# Altium PCB MISKO.PcbDoc
Units mm, origin at the board's own origin, x right, y up, seen from the top; angles counter-clockwise.
Board outline 90 x 90 mm, 2 copper layers (Top Layer, Bottom Layer), stack 1.569 mm thick; 98 components, 74 nets, 316 pads, 0 vias.
Unrouted connection lines stored in the file: 212.
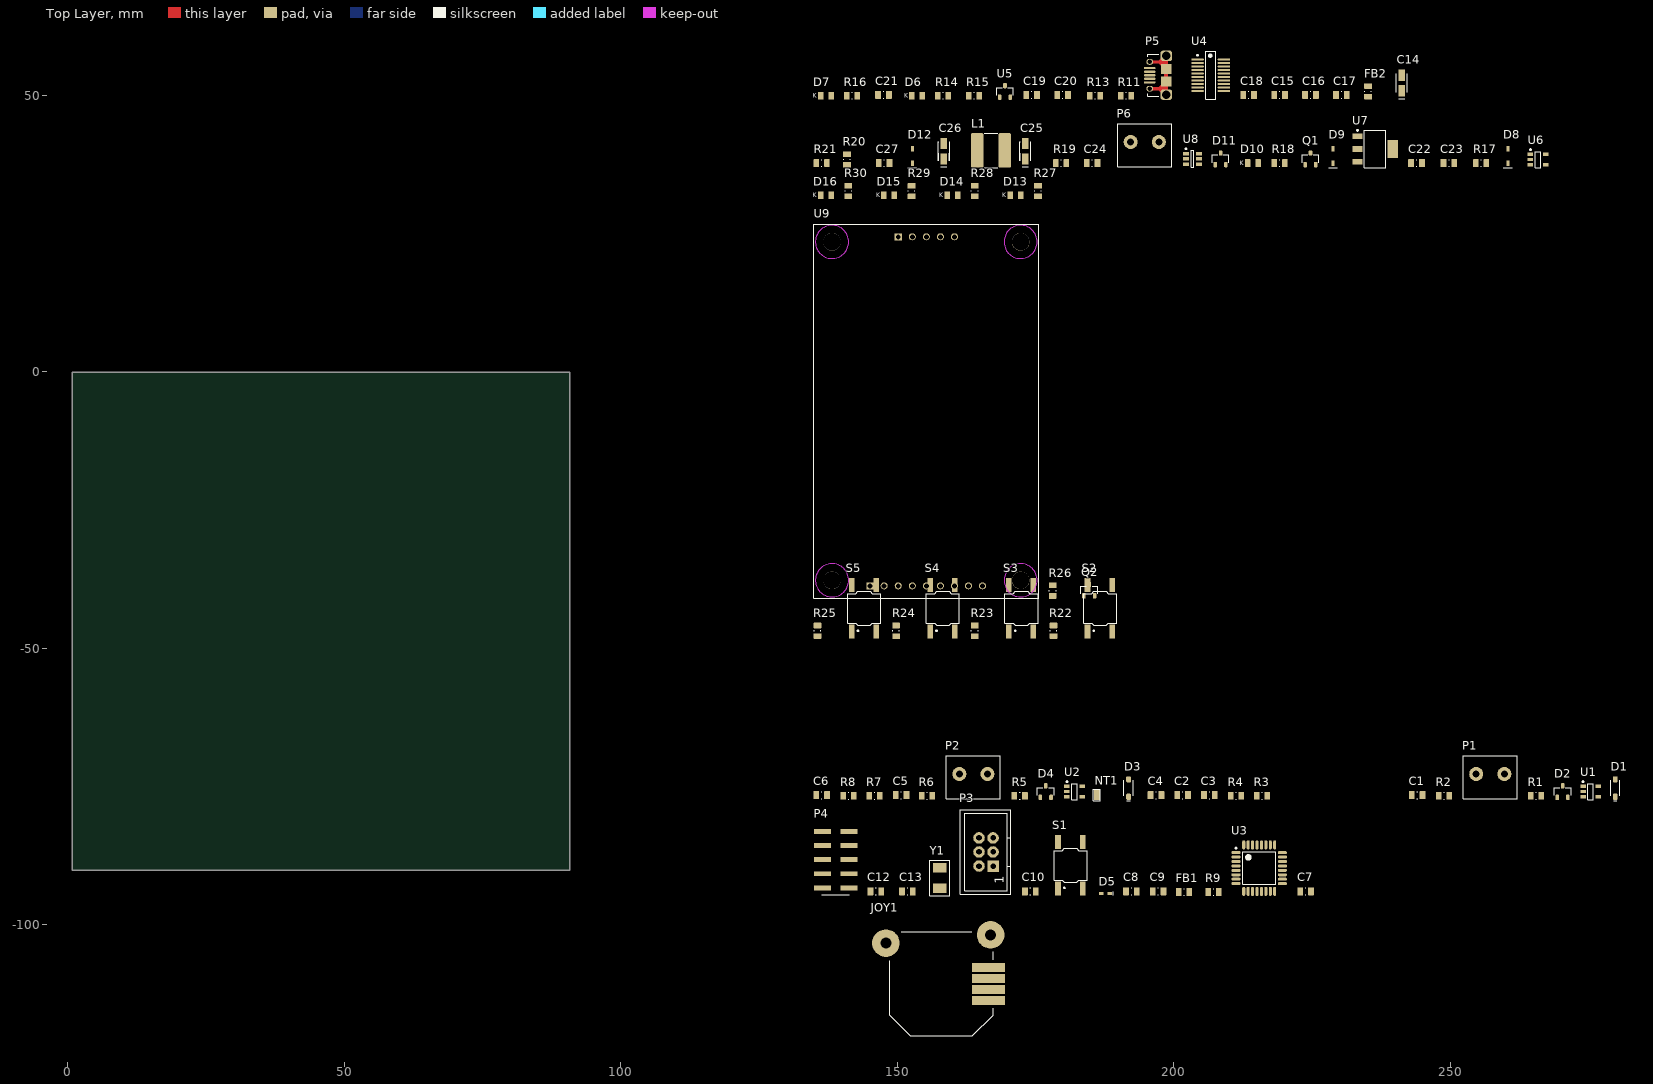
[diagram p0: Top Layer view]
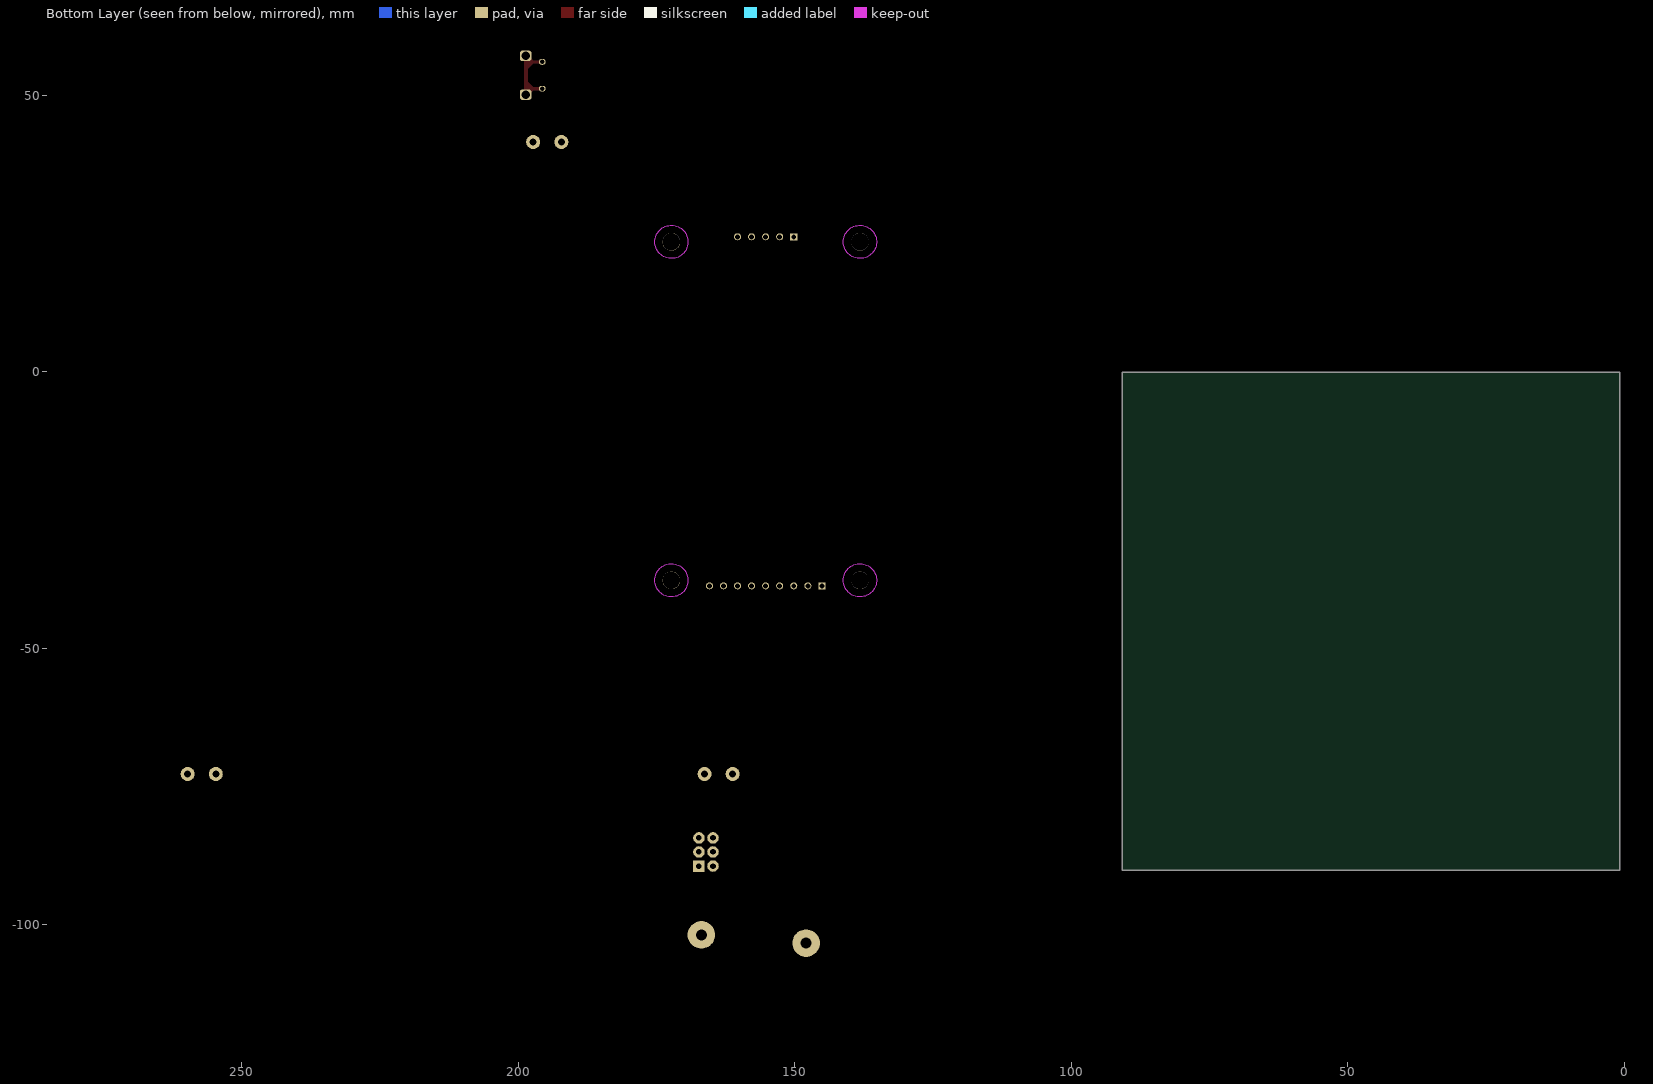
[diagram p1: Bottom Layer view, seen from below]

## Layer stack, top to bottom
Top Solder: solder mask 0.0254, SM-001, Dk 4
Top Layer: signal copper 0.035
Dielectric 1: core 1.4986, Core-043, Dk 4.3
Bottom Layer: signal copper 0.035
Bottom Solder: solder mask 0.0254, SM-001, Dk 4

## Board outline
0.78,-90.114 90.78,-90.114 90.78,-0.114 0.78,-0.114

## Design rules (kind name [scope] priority, off if disabled: settings)
Clearance [All] p1: gap=0.254 ignorepadtopadclearanceinfootprint=FALSE
DiffPairsRouting [All] p1: maxlimit=0.254 minlimit=0.254 mostfreqgap=0.254 toplayer_minwidth=0.381 toplayer_maxwidth=0.381 toplayer_prefwidth=0.381 bottomlayer_minwidth=0.381 bottomlayer_maxwidth=0.381 bottomlayer_prefwidth=0.381 maxuncoupledlength=12.7
PolygonConnect [All] p1: connectstyle=Relief reliefconductorwidth=0.254 reliefentries=4 polygonreliefangle="90 Angle" airgapwidth=0.254
RoutingVias [All] p1: holewidth=0.711 width=1.27 viastyle="Through Hole" minholewidth=0.711 minwidth=1.27 maxholewidth=0.711 maxwidth=1.27
SolderMaskExpansion [All] p1: expansion=0 istentingtop=FALSE
SupplyNets "Schematic Supply Nets_9" [InNet('+5V USB')] p1: voltage=0.000
SupplyNets "Schematic Supply Nets_8" [InNet('+5V')] p2: voltage=0.000
SupplyNets "Schematic Supply Nets_7" [InNet('AGND')] p3: voltage=0.000
SupplyNets "Schematic Supply Nets_6" [InNet('+5V SMPS')] p4: voltage=0.000
SupplyNets "Schematic Supply Nets_5" [InNet('VCCIO')] p5: voltage=0.000
SupplyNets "Schematic Supply Nets_4" [InNet('VCC')] p6: voltage=0.000
SupplyNets "Schematic Supply Nets_3" [InNet('SHLD')] p7: voltage=0.000
SupplyNets "Schematic Supply Nets_2" [InNet('AVCC')] p8: voltage=0.000
SupplyNets "Schematic Supply Nets_1" [InNet('GND')] p9: voltage=0.000
SupplyNets "Schematic Supply Nets" [InNet('VCCUSB')] p10: voltage=0.000
Width [All] p1: maxlimit=0.254 minlimit=0.254 preferedwidth=0.254
29 further rules are at their usual default settings.

## Classes and differential pairs
net class LED[1..4]: LED1 LED2 LED3 LED4
net class "LCD+SDC signals": BCKL_EN "LCD CS" "LCD+SDC signals.LCD DC" "LCD+SDC signals.LCD RST" "LCD+SDC signals.MISO" "LCD+SDC signals.MOSI" "LCD+SDC signals.SCK" "LCD+SDC signals.SD CS"
net class BTN[1..4]: BTN1 BTN2 BTN3 BTN4
component class U_USB: C14 C15 C16 C17 C18 C19 C20 C21 D6 D7 FB2 P5 R11 R13 R14 R15 R16 U4 U5
component class U_PS: C22 C23 C24 C25 C26 C27 D8 D9 D10 D11 D12 L1 P6 Q1 R17 R18 R19 R20 R21 U6 U7 U8
component class U_LED: D13 D14 D15 D16 R27 R28 R29 R30
component class U_LCD: Q2 R26 U9
component class U_BTN: R22 R23 R24 R25 S2 S3 S4 S5
component class U_ANLG: C1 C2 C3 C4 C5 C6 D1 D2 D3 D4 JOY1 NT1 P1 P2 R1 R2 R3 R4 R5 R6 R7 R8 U1 U2
component class MISKO: C7 C8 C9 C10 C12 C13 D5 FB1 P3 P4 R9 S1 U3 Y1
differential pair DF: +DF_P -DF_N
differential pair D: +D_P -D_N

## Components (designator, comment, footprint, x,y, rotation, side; value= is the part's Value field where it differs from the comment)
C1 "comment" C_0805 244.044,-76.558 r0 top value=100n
C2 "comment" C_0805 201.626,-76.558 r0 top value=100n
C3 "comment" C_0805 206.452,-76.558 r0 top value=100n
C4 "comment" C_0805 196.8,-76.558 r0 top value=1u
C5 "comment" C_0805 150.699,-76.558 r0 top value=100n
C6 "comment" C_0805 136.348,-76.558 r0 top value=1u
C7 "comment" C_0805 223.851,-93.957 r0 top value=100n
C8 "comment" C_0805 192.355,-93.957 r0 top value=100n
C9 "comment" C_0805 197.181,-93.957 r0 top value=100n
C10 "comment" C_0805 174.067,-93.957 r0 top value=10n
C12 "comment" C_0805 146.127,-93.957 r0 top value=18p
C13 "comment" C_0805 151.842,-93.957 r0 top value=18p
C14 "comment" "Tantalum Case A" 241.25,52.22 r90 top value=4u7
C15 "comment" C_0805 219.152,50.061 r0 top value=10n
C16 "comment" C_0805 224.74,50.061 r0 top value=100n
C17 "comment" C_0805 230.328,50.061 r0 top value=100n
C18 "comment" C_0805 213.564,50.061 r0 top value=100n
C19 "comment" C_0805 174.321,50.061 r0 top value=47p
C20 "comment" C_0805 179.909,50.061 r0 top value=47p
C21 "comment" C_0805 147.524,50.061 r0 top value=4p7
C22 "comment" C_0805 243.917,37.742 r0 top value=4u7
C23 "comment" C_0805 249.759,37.742 r0 top value=4u7
C24 "comment" C_0805 185.243,37.742 r0 top value=100n
C25 "comment" "Tantalum Case A" 173.178,39.901 r90 top value=22u
C26 "comment" "Tantalum Case A" 158.446,39.901 r90 top value=47u
C27 "comment" C_0805 147.651,37.742 r0 top value=100n
D1 "3.6V" SOD-123_N 279.858,-75.288 r90 top
D2 "DB3X313F" SOT23-3 270.333,-75.923 r0 top
D3 "3.6V" SOD-123_N 191.847,-75.288 r90 top
D4 "DB3X313F" SOT23-3 176.861,-75.923 r0 top
D5 "5.3V" SOD-523 187.656,-94.338 r0 top
D6 "comment" LED_0805 153.62,49.934 r0 top
D7 "LED Yellow" LED_0805 137.11,49.934 r0 top
D8 "BAT760-7" SOD-323 260.427,39.012 r90 top
D9 "BAT760-7" SOD-323 228.804,39.012 r90 top
D10 "LED Red" LED_0805 214.326,37.742 r0 top
D11 "BAS16" SOT23-3 208.484,38.504 r0 top
D12 "BAT760-7" SOD-323 152.731,39.012 r90 top
D13 "LED Blue" LED_0805 171.4,31.9 r0 top
D14 "LED Blue" LED_0805 159.97,31.9 r0 top
D15 "LED Blue" LED_0805 148.54,31.9 r0 top
D16 "LED Blue" LED_0805 137.11,31.9 r0 top
FB1 "value" SMD_0805 201.88,-94.084 r0 top
FB2 "value" SMD_0805 235.154,50.696 r90 top
JOY1 "joystick" PSP1000JOY 158,-110.725 r180 top
L1 "680mA" IND_6060_N 166.955,40.028 r0 top value=100u
NT1 "net tie 2-way" "NET TIE 2-way" 186.132,-76.558 r90 top net-tie
P1 "ANLG IN 1" "VRSTNA SPONKA 2P/16A" 257.252,-72.748 r0 top
P2 "ANGL IN 2" "VRSTNA SPONKA 2P/16A" 163.78,-72.748 r0 top
P3 "ISP" "HEADER 2X3 SHROUDED" 166.066,-86.845 r90 top
P4 "AUX SGNLS" "HEADER SMD 2X5 100 MILS" 138.888,-88.242 r90 top
P5 "micro USB B" micro-USB-HRS-ZX62D-B-5PA8 198.578,53.617 r0 top
P6 "Power in" "VRSTNA SPONKA 2P/16A" 194.768,41.552 r0 top
Q1 "2N7002,215" SOT23-3 224.74,38.504 r0 top
Q2 "PMV160UP,215" SOT23-3 184.735,-39.474 r0 top
R1 "comment" R_0805 265.507,-76.685 r0 top value=1k
R2 "comment" R_0805 248.87,-76.685 r0 top value=100R
R3 "comment" R_0805 215.977,-76.685 r0 top value=9k1
R4 "comment" R_0805 211.278,-76.685 r0 top value=1k
R5 "comment" R_0805 172.162,-76.685 r0 top value=1k
R6 "comment" R_0805 155.398,-76.685 r0 top value=100R
R7 "comment" R_0805 145.873,-76.685 r0 top value=100k
R8 "comment" R_0805 141.174,-76.685 r0 top value=1k
R9 "comment" R_0805 207.214,-94.084 r0 top value=100k
R11 "comment" R_0805 191.339,49.934 r0 top value=27R
R13 "comment" R_0805 185.751,49.934 r0 top value=27R
R14 "comment" R_0805 158.319,49.934 r0 top value=1M
R15 "comment" R_0805 163.907,49.934 r0 top value=270R
R16 "comment" R_0805 141.809,49.934 r0 top value=270R
R17 "comment" R_0805 255.601,37.742 r0 top value=10k
R18 "comment" R_0805 219.152,37.742 r0 top value=270R
R19 "comment" R_0805 179.655,37.742 r0 top value=100k
R20 "comment" R_0805 140.92,38.377 r90 top value="52k3 1%"
R21 "comment" R_0805 136.348,37.742 r0 top value="10k 1%"
R22 "1k" R_0805 178.258,-46.84 r90 top
R23 "1k" R_0805 164.034,-46.84 r90 top
R24 "1k" R_0805 149.81,-46.84 r90 top
R25 "1k" R_0805 135.586,-46.84 r90 top
R26 "10R" R_0805 178.131,-39.601 r90 top
R27 "270R" R_0805 175.464,32.662 r90 top
R28 "270R" R_0805 164.034,32.662 r90 top
R29 "270R" R_0805 152.604,32.662 r90 top
R30 "270R" R_0805 141.174,32.662 r90 top
S1 "" "PUSH BUTTON 6x6 mm" 181.306,-89.258 r90 top
S2 "" "PUSH BUTTON 6x6 mm" 186.64,-42.776 r90 top
S3 "" "PUSH BUTTON 6x6 mm" 172.416,-42.776 r90 top
S4 "" "PUSH BUTTON 6x6 mm" 158.192,-42.776 r90 top
S5 "" "PUSH BUTTON 6x6 mm" 143.968,-42.776 r90 top
U1 "ADA4000-1" SOT23-5 275.413,-75.923 r0 top
U2 "ADA4000-1" SOT23-5 182.068,-75.923 r0 top
U3 "ATmega328PB-AUR" 32A_N 215.469,-89.766 r0 top
U4 "FT231XS-R" SSOP-20 206.706,53.617 r0 top
U5 "TPD2E009DBZR" SOT23-3 169.495,50.696 r0 top
U6 "STMPS2151" SOT23-5 265.888,38.377 r0 top
U7 "REG1117-3.3" SOT-223-4 236.424,40.282 r0 top
U8 "LM2734" SOT-23-6-THIN 203.404,38.504 r0 top
U9 "TFT LCD 2.2" "LCD tft 2.2" 155.271,-7.089 r90 top
Y1 "16MHz" "TXC 7a QUARTZ CRYSTAL" 157.684,-91.544 r90 top

## Footprints (in the part's own frame and the unit in brackets; to place one, negate y for a bottom-side part, rotate by r counter-clockwise, add the part's x,y. Pads: shape width x height; smd on the part's side, far side on the other; paste and mask are expansions set on the pad)
32A_N [mm]
  oval 1.65x0.55 smd: 1(-4.2,2.8) 2(-4.2,2) 3(-4.2,1.2) 4(-4.2,0.4) 5(-4.2,-0.4) 6(-4.2,-1.2) 7(-4.2,-2) 8(-4.2,-2.8) 17(4.2,-2.8) 18(4.2,-2) 19(4.2,-1.2) 20(4.2,-0.4) 21(4.2,0.4) 22(4.2,1.2) 23(4.2,2) 24(4.2,2.8)
  oval 0.55x1.65 smd: 9(-2.8,-4.2) 10(-2,-4.2) 11(-1.2,-4.2) 12(-0.4,-4.2) 13(0.4,-4.2) 14(1.2,-4.2) 15(2,-4.2) 16(2.8,-4.2) 25(2.8,4.2) 26(2,4.2) 27(1.2,4.2) 28(0.4,4.2) 29(-0.4,4.2) 30(-1.2,4.2) 31(-2,4.2) 32(-2.8,4.2)
  silkscreen extent -4.32,-2.95 2.95,3.75, body extent -3.5,-3.5 3.5,3.5, height 1.2
C_0805 [mm] "Chip Capacitor, 2-Leads, Body 2.05x1.25mm, IPC Medium Density"
  rrect15% 1.05x1.45 smd: 1(-0.975,0) 2(0.975,0)
  silkscreen extent -0.05,-0.63 0.05,0.63, body extent -1.1,-0.7 1.1,0.7, height 1.4
"HEADER 2X3 SHROUDED" [mil]
  rect 82x82 hole 39.37: 1(-100,-50)
  round 82 hole 39.37: 2(-100,50) 3(0,-50) 4(0,50) 5(100,-50) 6(100,50)
  silkscreen extent -300,-175 300,185, body extent -300,-175 300,187, height 372
"HEADER SMD 2X5 100 MILS" [mm]
  rect 0.9x3.1 smd: 1(-5.08,-2.425) 2(-5.08,2.425) 3(-2.54,-2.425) 4(-2.54,2.425) 5(0,-2.425) 6(0,2.425) 7(2.54,-2.425) 8(2.54,2.425) 9(5.08,-2.425) 10(5.08,2.425)
  silkscreen extent -6.33,-2.45 -6.33,2.55, body extent -6.33,-3.55 6.37,3.65, height 9.85
IND_6060_N [mm] "Inductor, Chip; 6.00 mm L X 6.00 mm W X 2.80 mm H body"
  rrect22% 2.24x6.22 smd: 1(-2.49,0) 2(2.49,0)
  silkscreen extent -1.19,-3.1 1.19,3.1, body extent -3,-3 3,3, height 4.51
"LCD tft 2.2" [mm]
  rect 1.27x1.27 hole 0.9: 1(-31.627,10.16) 10(31.5,5.08)
  round 1.27 hole 0.9: 2(-31.627,7.62) 3(-31.627,5.08) 4(-31.627,2.54) 5(-31.627,0) 6(-31.627,-2.54) 7(-31.627,-5.08) 8(-31.627,-7.62) 9(-31.627,-10.16) 11(31.5,2.54) 12(31.5,0) 13(31.5,-2.54) 14(31.5,-5.08)
  round 3.2 hole 3.2 unplated paste-2539.97: M1(-30.627,17.05) M2(30.573,17.05) M3(-30.627,-17.05) M4(30.573,-17.05)
  Keep-Out Layer circle w0.102: c-30.627,17.05 r3
  Keep-Out Layer circle w0.102: c-30.627,-17.05 r3
  Keep-Out Layer circle w0.102: c30.573,-17.05 r3
  Keep-Out Layer circle w0.102: c30.573,17.05 r3
  silkscreen extent -33.91,-20.3 33.78,20.34, body extent -33.5,-20 33.5,20, height 17.11
LED_0805 [mm] "SMD LED, 2-Leads, Body 2.05x1.25mm, IPC Medium Density"
  rrect15% 1x1.4 smd: 1(-0.95,0) 2(0.95,0)
  body extent -1,-0.62 1,0.63, height 0.7
micro-USB-HRS-ZX62D-B-5PA8 [mm]
  rrect100% 1.25x1.05 hole 0.85: 0(-2.905,-2.425) 0(-2.905,2.425)
  rrect50% 2.1x1.9 hole 1.5: 0(0.095,-3.512) 0(0.095,3.512)
  rect 1.9x1.8 smd: 0(0.095,-1.15) 0(0.095,1.15)
  rrect50% 2x0.4 smd: 1(-2.905,-1.3) 2(-2.905,-0.65) 3(-2.905,0) 4(-2.905,0.65) 5(-2.905,1.3)
  Top Layer region: -2.921,-2.159 -1.27,-2.159 -0.254,-1.143 -0.254,1.143 -1.27,2.159 -2.921,2.159 -2.921,2.667 -1.27,2.667 -0.381,3.556 0.381,3.556 0.381,-3.556 -0.381,-3.556 -1.27,-2.667 -2.921,-2.667
  silkscreen extent -3.3,-3.81 -1.27,3.81, body extent -2.65,-4.1 2.78,4.1, height 2.68
"NET TIE 2-way" [mil] "2-way net tie junction"
  rrect5% 40x40 smd paste-100: 1(-15,0) 2(15,0)
  silkscreen extent -40,-25 40,25
PSP1000JOY [mm]
  rect 6x1.65 smd: 1(-8.5,-3) 2(-8.5,-1) 3(-8.5,1) 4(-8.5,3)
  round 5 hole 2: 5(-8.904,-8.904) 6(10.055,-7.4)
  silkscreen extent -9.38,-9.5 9.38,9.38, body extent -11.82,-11.82 12.1,9.48, height 9.65
"PUSH BUTTON 6x6 mm" [mm]
  rect 2.5x1 smd: 1(-4.191,2.222) 2(-4.191,-2.223) 3(4.191,-2.222) 4(4.191,2.223)
  silkscreen extent -4.19,-3.06 3.05,2.94, body extent -4.44,-2.98 4.56,3.02, height 5
R_0805 [mm] "Chip Resistor, 2-Leads, Body 2.05x1.25mm, IPC Medium Density"
  rrect15% 1x1.4 smd: 1(-0.95,0) 2(0.95,0)
  silkscreen extent -0.05,-0.6 0.05,0.6, body extent -1.1,-0.7 1.1,0.7, height 0.8
SMD_0805 [mm] "Chip 2-Leads, Body 2.05x1.25mm, IPC Medium Density"
  rrect15% 1x1.4 smd: 1(-0.95,0) 2(0.95,0)
  silkscreen extent -0.05,-0.6 0.05,0.6, body extent -1.1,-0.7 1.1,0.7, height 0.8
SOD-123_N [mm] "Diode, Small Outline Diode (SOD); 2.675 mm L X 1.60 mm W X 1.30 mm H body"
  rrect51% 1.12x0.86 smd: A(1.575,0) C(-1.575,0)
  silkscreen extent -2.31,-0.85 1.4,0.85, body extent -1.8,-0.8 1.8,0.8, height 1.3
SOD-323 [mm]
  rect 1x0.55 smd: A(1.3,0) C(-1.3,0)
  silkscreen extent -2.16,-0.8 -2.16,0.8, body extent -1.3,-0.67 1.3,0.68, height 1.1
SOD-523 [mm]
  rect 0.825x0.5 smd: A(-0.788,0) C(0.788,0)
  silkscreen extent 1.4,-0.3 1.4,0.3, body extent -0.82,-0.45 0.87,0.45, height 0.7
SOT23-3 [mm] "Small Outline Transistor (SOT23), 0.96 mm pitch; 3 pin, 2.92 mm L X 1.30 mm W X 1.12 mm H body"
  rrect49% 0.65x0.96 smd: 1(-0.96,-1.045) 2(0.96,-1.045) 3(0,1.045)
  silkscreen extent -1.52,-0.7 1.52,0.7, body extent -1.46,-1.18 1.46,1.18, height 1.12
SOT23-5 [mm]
  rect 1x0.6 smd: 1(-1.375,0.95) 2(-1.375,0) 3(-1.375,-0.95) 4(1.375,-0.95) 5(1.375,0.95)
  silkscreen extent -1.5,-1.45 0.5,1.92, body extent -1.41,-1.45 1.41,1.45, height 1.45
SOT-23-6-THIN [mm] "6-  pin Thin SOT package"
  rect 1.1x0.65 smd: 1(-1.2,0.95) 2(-1.2,0) 3(-1.2,-0.95) 4(1.2,-0.95) 5(1.2,0) 6(1.2,0.95)
  silkscreen extent -1.32,-1.55 0.25,1.95, body extent -0.9,-1.55 0.9,1.55, height 1
SOT-223-4 [mm]
  rect 1.85x1 smd: 1(-3.175,2.3) 2(-3.175,0) 3(-3.175,-2.3)
  rect 1.85x3.2 smd: 4(3.175,0)
  silkscreen extent -3.3,-3.35 1.95,3.47, body extent -1.85,-3.35 1.85,3.35, height 1.8
SSOP-20 [mm]
  oval 2.25x0.4 smd: 1(-2.375,2.857) 2(-2.375,2.222) 3(-2.375,1.587) 4(-2.375,0.953) 5(-2.375,0.318) 6(-2.375,-0.318) 7(-2.375,-0.953) 8(-2.375,-1.587) 9(-2.375,-2.222) 10(-2.375,-2.857) 11(2.375,-2.857) 12(2.375,-2.222) 13(2.375,-1.587) 14(2.375,-0.953) 15(2.375,-0.318) 16(2.375,0.318) 17(2.375,0.953) 18(2.375,1.587) 19(2.375,2.222) 20(2.375,2.857)
  silkscreen extent -2.5,-4.35 0.9,4.35, body extent -1.99,-4.37 1.99,4.37, height 1.76
"Tantalum Case A" [mm]
  rect 2x1.2 smd: 1(-1.4,0) 2(1.4,0)
  silkscreen extent -2.87,-1.02 1.7,1.02, body extent -1.66,-0.86 1.74,0.94, height 1.8
"TXC 7a QUARTZ CRYSTAL" [mm] "TXC 7A series crysal oscillator footprint 5X3.2"
  rect 1.7x2.4 smd: 1(-1.85,0) 2(1.85,0)
  silkscreen extent -3.17,-1.78 3.17,1.78, body extent -2.5,-1.6 2.5,1.6, height 1.26
"VRSTNA SPONKA 2P/16A" [mm]
  round 2.54 hole 1.27: 1(-2.54,0) 2(2.54,0)
  silkscreen extent -4.88,-4.44 4.88,3.3, body extent -5,-4.57 5,3.43, height 10.01

## Part data
C1 C2 C3 C4 C5 C6 C7 C8 C9 C10 C12 C13 C15 C16 C17 C18 C19 C20 C21 C22 C23 C24 C27: library part Capacitor, "Generic capacitor"
C14 C25 C26: library part "Capacitor - polarized", "Generic polarized capacitor"
D1 D3: library part MMSZ5227B, "Zener Single Diode, 3.6 V, 500 mW, SOD-123, 5 %, 2 Pins, 150 °C", HelpURL=https://www.farnell.com/datasheets/1670964.pdf, Manufacturer part number=MMSZ5227B
D2 D4: "Schottky Rectifier, 30 V, 130 mA, Dual Series, SOT-23, 3 Pins, 550 mV", HelpURL=https://www.farnell.com/datasheets/1912091.pdf, Manufacturer part number=DB3X313F
D5: library part ESD7371XV2T1G, "ESD Protection Device, 20 V, SOD-523, 2 Pins, 5.3 V, 300 mW, ESD7371 Series", HelpURL=https://www.farnell.com/datasheets/2907082.pdf, Manufacturer part number=ESD7371XV2T1G
D6: library part "LED Blue", "LED Blue"
D8 D9 D12: "Schottky Rectifier, 30 V, 1 A, Single, SOD-323, 2 Pins, 550 mV"
D11: "Silicon Switching Diode for High-Speed Switching"
FB1 FB2: library part "Ferrite bead", "Generic ferrite bead"
JOY1: "Analog joystick"
L1: library part SDR0604-101KL, "Power Inductor (SMD), 100 µH, 520 mA, Unshielded, 680 mA, SDR0604"
P1 P2 P6: library part "Screw terminal 2P 200mil", "Generic screw terminal, 2 poles, 200 mil pitch"
P3: library part "Pin header 2x3 shrouded", "Generic shrouded pin header, 2x3, male"
P4: library part M20-8760542P, "Pin Header, Vertical, Wire-to-Board, 2.54 mm, 2 Rows, 10 Contacts, Surface Mount Straight, M20-87", Manufacturer_Name=Harwin, Mouser Part Number=855-M20-8760542P, Datasheet Link=https://cdn.harwin.com/pdfs/M20-876P.pdf, Manufacturer_Part_Number=M20-8760542P, Mouser Price/Stock=https://www.mouser.co.uk/ProductDetail/Harwin/M20-8760542P?qs=vF78I%252BjhbY%252B9gKdT9lbnBA%3D%3D
P5: library part ZX62D-B-5PA8(30), "USB Connector, Micro USB Type B, USB 2.0, Receptacle, 5 Ways, Surface Mount, Through Hole Mount", Manufacturer=Hirose, Supplier Part Number 1=2300438, ComponentLink1Description=http://www.farnell.com/datasheets/1693470.pdf, ComponentLink1URL=http://www.farnell.com/datasheets/1693470.pdf, HelpURL=https://www.farnell.com/datasheets/2691174.pdf, Manufacturer part number=ZX62D-B-5PA8(30), Supplier 1=Farnell
Q1: "N-Channel Trench MOSFET, 60 V, 0.3 A, 3-Pin SOT23, Tape and Reel", Manufacturer="NXP Semiconductors", Supplier Part Number 1=568-1369-2-ND, Channel Type=N, Ciss [typ] (pF)=31, Code_JEDEC=TO-236AB, ComponentLink1Description="Manufacturer URL", ComponentLink1URL=http://www.nxp.com/, ComponentLink2Description=Datasheet, ComponentLink2URL=http://www.nxp.com/documents/data_sheet/2N7002.pdf, ComponentLink3Description="Package Specification", ComponentLink3URL=http://www.nxp.com/documents/outline_drawing/sot023_po.pdf, Coss [typ] (pF)=6.8, DatasheetVersion="Rev. 7", HelpURL=https://www.farnell.com/datasheets/1499179.pdf, ID [max] (A)=0.3, Mounting Technology="Surface Mount", PackageDescription="3-Pin Small Outline Transistor Package, Body 2.9 x 1.3 mm, Pitch 0.95 mm", PackageReference=SOT23, PackageVersion="06-03-16, 03/2006", Packing="Tape & Reel", PartNumber=2N7002,215, Qr [typ] (nC)=30, Supplier 1=Digi-Key, Supplier 2=Digi-Key, Supplier 3=Digi-Key, Supplier 4=Farnell, Supplier 5=Farnell, Supplier 6=Farnell, Supplier 7=Newark, Supplier 8=Newark, Supplier 9=Mouser, Supplier Part Number 2=568-1369-1-ND, Supplier Part Number 3=568-1369-6-ND, Supplier Part Number 4=2315576, Supplier Part Number 5=1510761, Supplier Part Number 6=1510761RL, Supplier Part Number 7=75R4879, Supplier Part Number 8=70R9742, Supplier Part Number 9=771-2N7002-T/R, VDS [max] (V)=60, VGSth [typ] (V)=2
Q2: "P-Channel Trench MOSFET, -20 V, -1.2 A, -55 to 150 degC, 3-Pin SOT23, Tape and Reel", Manufacturer="NXP Semiconductors", Supplier Part Number 1=568-10320-2-ND, Channel Type=P, Ciss [typ] (pF)=365, Code_JEDEC=TO-236AB, ComponentLink1Description="Manufacturer URL", ComponentLink1URL=http://www.nxp.com/, ComponentLink2Description=Datasheet, ComponentLink2URL=http://www.nxp.com/documents/data_sheet/PMV160UP.pdf, ComponentLink3Description="Package Specification", ComponentLink3URL=http://www.nxp.com/documents/outline_drawing/sot023_po.pdf, Coss [typ] (pF)=42, DatasheetVersion="Rev. 2", HelpURL=https://eu.mouser.com/datasheet/2/916/PMV160UP-1600107.pdf, ID [max] (A)=-1.2, Mounting Technology="Surface Mount", PackageDescription="3-Pin Small Outline Transistor Package, Body 2.9 x 1.3 mm, Pitch 0.95 mm", PackageReference=SOT23, PackageVersion="06-03-16, 03/2006", Packing="Tape & Reel", PartNumber=PMV160UP,215, Supplier 1=Digi-Key, Supplier 2=Digi-Key, Supplier 3=Digi-Key, Supplier 4=Newark, Supplier 5=Mouser, Supplier Part Number 2=568-10320-1-ND, Supplier Part Number 3=568-10320-6-ND, Supplier Part Number 4=54T9404, Supplier Part Number 5=771-PMV160UP215, VDS [max] (V)=-20, VGSth [typ] (V)=-0.7
R1 R2 R3 R4 R5 R6 R7 R8 R9 R11 R13 R14 R15 R16 R17 R18 R19 R20 R21 R22 R23 R24 R25 R26 R27 R28 R29 R30: library part Resistor, "Generic resistor"
S1 S2 S3 S4 S5: library part "Push button", "Generic push button"
U1 U2: "Operational Amplifier, Single, 1 Amplifier, 5 MHz, 20 V/µs, ± 4V to ± 18V, TSOT, 5 Pins", Case=SOT, Manufacturer="Analog devices", Manufacturer Number=ADA4000-1AUJZ-R7, Part Number=XOG0003, Supply voltage max=+-18V, Category="Integrated circuits", Dealer=Farnell, Dealer number=2461002, Devices=1, HelpURL=https://www.farnell.com/datasheets/698265.pdf, Price=1.97, Technology=SMT
U3: "8-bit AVR Microcontroller, 32KB Flash, 1KB EEPROM, 2KB SRAM, 32-pin TQFP, Industrial Grade (-40°C to 85°C), Reel", HelpURL=http://ww1.microchip.com/downloads/en/DeviceDoc/40001907A.pdf, Manufacturer part number=ATmega328PB-AUR
U4: "USB to Full-Handshake UART Interface Chip, UHCI/OHCI/EHCI Compatible, USB 2.0 Compatible, -40 to +85 degC, 20-Pin SSOP, Pb-Free, Tape and Reel", Manufacturer=FTDI, Code_JEDEC=MO-137-AD, ComponentLink1Description="Manufacturer URL", ComponentLink1URL=http://www.ftdichip.com/, ComponentLink2Description=Datasheet, ComponentLink2URL=http://www.ftdichip.com/Support/Documents/DataSheets/ICs/DS_FT231X.pdf, ComponentLink3Description="FT231X Product Page", ComponentLink3URL=www.ftdichip.com/Products/ICs/FT231X.html, DatasheetVersion="ver 1.2, Feb-2013", HelpURL=https://www.farnell.com/datasheets/1913754.pdf, PackageDescription="20-Pin Small Outline Package, 8.6 x 3.9 mm Body, 0.635 mm Pitch", PackageReference=SSOP-20, PackageVersion=Feb-13, PartNumber=FT231XS-R
U5: "ESD protection for high-speed interfaces", Manufacturer="Texas Instruments", Category="diode array", Dealer=Mouser, Dealer number=595-TPD2E009DBZR, HelpURL=http://www.ti.com/general/docs/suppproductinfo.tsp?distId=26&gotoUrl=http%3A%2F%2Fwww.ti.com%2Flit%2Fgpn%2Ftpd2e009, Manufacturer Number=TPD2E009DBZR, Price=0.174, Technology=SMT
U6: "Power Load Switch, Single High Side, Active High, 1 Output, 5V, 0.5A, SOT-23-5", Supplier Part Number 1=1842616, HelpURL=https://www.farnell.com/datasheets/1700527.pdf, Manufacturer part number=STMPS2151, Supplier 1=Farnell
U7: "Single Output LDO, 800 mA, Fixed 3.3 V Output, 3.8 to 15 V Input, with Internal Current Limiting, 4-pin SOT-223 (DCY), -40 to 125 degC, Green (RoHS & no Sb/Br)", Manufacturer="Texas Instruments", Rating=Catalog, Supplier Part Number 1=REG1117-3.3-ND, Code_JEDEC=TO-261, ComponentLink1Description="Manufacturer URL", ComponentLink1URL=http://www.ti.com/, ComponentLink2Description=Datasheet, ComponentLink2URL=http://www.ti.com/general/docs/lit/getliterature.tsp?genericPartNumber=REG1117-33&fileType=pdf, ComponentLink3Description="Package Specification", ComponentLink3URL=http://www.ti.com/litv/pdf/mpds094a, DatasheetVersion=SBVS001D, Eco-Plan="Green (RoHS & no Sb/Br)", Fixed Output Options(V)=5, HelpURL=http://www.ti.com/general/docs/suppproductinfo.tsp?distId=26&gotoUrl=http%3A%2F%2Fwww.ti.com%2Flit%2Fgpn%2FREG1117, Iout(Max)(A)=0.8, Iq(Typ)(mA)=4, Mounting Technology="Surface Mount", PackageDescription="4-Pin Plastic Small Outline, Body 3.5 x 6.5 mm, Pitch 2.3 mm", PackageReference=DCY4, PackageVersion=4202506/B, PartNumber=REG1117-3.3, SubFamily="Single Channel LDO", Supplier 1=Digi-Key, Supplier 2=Farnell, Supplier 3=Farnell, Supplier 4=Newark, Supplier 5=Mouser, Supplier Part Number 2=1212355, Supplier Part Number 3=2126471, Supplier Part Number 4=35C1963, Supplier Part Number 5=595-REG1117-3.3, Vdo(Typ)(mV)=1100, Vin(Max)(V)=15, Vin(Min)(V)=3.8, Vout Adj(Max)(V)=3.3, Vout Adj(Min)(V)=3.3
U8: "Thin SOT23 1A Load Step-Down DC-DC Regulator", DigiKeyPartNumber=LM2734XMKCT-ND, Manufacturer="National Semiconductor", PackageTopMarking=SFDB*XTT, PartNumber=LM2734XMK, PowerWise=N, Code_IPC=SOT26A-6, Code_JEDEC=MO-193-AA, ComponentLink1Description="LM2734 Datasheet", ComponentLink1URL=http://www.national.com/ds/LM/LM2734.pdf, ComponentLink2Description="LM2734 Web Page", ComponentLink2URL=http://www.national.com/pf/LM/LM2734.html, ComponentLink3Description="MK06A Package Page", ComponentLink3URL=http://www.national.com/packaging/folders/mk06a.html, CompType=Switcher, DatasheetVersion=Jun-2008, FirstPublished=4-Dec-2008, HelpURL=https://www.ti.com/lit/ds/symlink/lm2734.pdf, PackageDescription="Molded TSOT, 2.97 x 1.65 x 0.87mm Body, 6 Lead, 0.95mm Pitch", PackageReference=MK06A, PackageVersion="revD, Jul-2005", PinCount=6, Publisher="Altium Limited", RoHS=Y, Supplier 1=Farnell, Supplier 2=Farnell
U9: "LCD 320x240, 65536 color, ILI3941"
Y1: library part 7A-16.000MAAJ-T, "Crystal, 16 MHz, SMD, 5mm x 3.2mm, 30 ppm, 18 pF, 30 ppm, 7A Series", Case=5X3.2, Frequency tolerance=30ppm, Load capacitance=18pF, Manufacturer=TCX, Category=Crystals, Dealer=Farnell, Dealer number=1841946, HelpURL=https://www.farnell.com/datasheets/1041607.pdf, Manufacturer Number=7A-16.000MAAJ-T, Price=0.91, Technology=SMT

## Nets (pads, with @x,y where several pads share a name; then routed paths per layer and width w, separated by ;. In a path a pad name is that pad's centre, name@x,y a point inside that pad or via, vN(x,y) a via of type N, cw(c..) or ccw(c..) an arc to the next point about the centre after c; other vN are vias at no path point)
+5V: C22.1 D8.C D9.C P4.1 U7.3
"+5V SMPS": C26.1 C27.1 D9.A L1.2 R20.2
"+5V USB": D8.A U6.1
AGND: C1.2 C2.2 C3.2 C5.2 JOY1.3 NT1.1 P1.1 P2.1 R4.1 R8.1
ANLG1: C1.1 R2.2 U3.26
ANLG2: C5.1 R6.2 U3.25
AREF: C9.1 P4.5 U3.20
AVCC: C4.1 C6.1 C8.1 FB1.2 JOY1.1 U1.5 U2.5 U3.18
BCKL_EN: Q2.1 U3.10
BOOST: C24.1 D11.3 U8.1
BTN1: R22.1 U3.32
BTN2: R23.1 U3.1
BTN3: R24.1 U3.2
BTN4: R25.1 U3.9
D_N: C19.1 P5.2 R11.1 U5.2
D_P: C20.1 P5.3 R13.1 U5.1
DF_N: R11.2 U4.12
DF_P: R13.2 U4.11
FB: R20.1 R21.2 U8.3
GND: C4.2 C6.2 C7.2 C8.2 C9.2 C10.2 C12.2 C13.2 C14.2 C15.2 C16.2 C17.2 C18.2 C19.2 C20.2 C21.2 C22.2 C23.2 C25.2 C26.2 C27.2 D1.A D2.1 D3.A D4.1 D5.A D12.A D13.1 D14.1 D15.1 D16.1 NT1.2 P3.6 P4.9 P4.10 P5.5 P6.2 Q1.2 R14.1 R21.1 S1.1 S2.2 S3.2 S4.2 S5.2 U1.2 U2.2 U3.5 U3.21 U4.6 U4.16 U5.3 U6.2 U7.1 U8.2 U9.2 U9.14
JOY_X: C2.1 JOY1.2 U3.24
JOY_Y: C3.1 JOY1.4 U3.23
"LCD CS": U3.14 U9.3
"LCD LED": R26.1 U9.8
"LCD+SDC signals.LCD DC": U3.12 U9.5
"LCD+SDC signals.LCD RST": U3.11 U9.4
"LCD+SDC signals.MISO": P3.1 U3.16 U9.9 U9.12
"LCD+SDC signals.MOSI": P3.4 U3.15 U9.6 U9.11
"LCD+SDC signals.SCK": P3.3 U3.17 U9.7 U9.13
"LCD+SDC signals.SD CS": U3.13 U9.10
LED1: R27.2 U3.3
LED2: R28.2 U3.6
LED3: R29.2 U3.19
LED4: R30.2 U3.22
NetD2_3: D2.3 R1.2 U1.3
NetD4_3: D4.3 R5.2 U2.3
NetD6_1: D6.1 U4.17
NetD6_2: D6.2 R15.1
NetD7_1: D7.1 U4.10
NetD7_2: D7.2 R16.1
NetD10_1: D10.1 R18.1
NetD13_2: D13.2 R27.1
NetD14_2: D14.2 R28.1
NetD15_2: D15.2 R29.1
NetD16_2: D16.2 R30.1
NetP1_2: P1.2 R1.1
NetP2_2: P2.2 R5.1
NetQ1_3: Q1.3 R17.1 U6.4
NetQ2_3: Q2.3 R26.2
NetR2_1: R2.1 R3.2 U1.1
NetR3_1: R3.1 R4.2 U1.4
NetR6_1: R6.1 R7.2 U2.1
NetR7_1: R7.1 R8.2 U2.4
NetR18_2: R18.2 U6.3
NetR19_2: R19.2 U8.4
NetR22_2: R22.2 S2.1
NetR23_2: R23.2 S3.1
NetR24_2: R24.2 S4.1
NetR25_2: R25.2 S5.1
nRST: C10.1 D5.C P3.5 P4.7 R9.2 S1.2 U3.29
PC4: P4.6 U3.27
PC5: P4.8 U3.28
PWR_EN#: Q1.1 U4.19
RXD: P4.4 U3.30 U4.20
SHLD: C21.1 P5.0 R14.2
SW: C24.2 D12.C L1.1 U8.6
TXD: P4.2 U3.31 U4.4
VBUS: C15.1 FB2.1 P5.1
VCC: C7.1 C23.1 D1.C D2.2 D3.C D4.2 FB1.1 P3.2 P4.3 Q2.2 R9.1 U3.4 U7.2 U7.4 U9.1
VCCIO: C17.1 C18.1 R15.2 R16.2 U4.3 U4.13 U4.14
VCCUSB: C14.1 C16.1 D10.2 FB2.2 R17.2 U4.15 U6.5
VIN: C25.1 D11.1 P6.1 R19.1 U8.5
XTAL1: C13.1 U3.7 Y1.2
XTAL2: C12.1 U3.8 Y1.1
pads on no net: D11.2 JOY1.5 JOY1.6 P5.4 S1.3 S1.4 S2.3 S2.4 S3.3 S3.4 S4.3 S4.4 S5.3 S5.4 U4.1 U4.2 U4.5 U4.7 U4.8 U4.9 U4.18 U9.M1 U9.M2 U9.M3 U9.M4

## Silkscreen, mask and mechanical layers (free items; w line width, h text height)
Board Shape:
  lines w0.254: 0.5,-90.5 0.5,-0.5 90.5,-0.5 90.5,-90.5 0.5,-90.5
Top Component Location:
  drawing of 2363 lines, arcs and shapes, not listed
Bottom Component Location:
  drawing of 2890 lines, arcs and shapes, not listed

## Text inside footprints (layer, text, board x,y; h text height)
D6: Top Overlay "K" at 151.258,49.578 h0.8
D7: Top Overlay "K" at 134.748,49.578 h0.8
D10: Top Overlay "K" at 211.964,37.386 h0.8
D13: Top Overlay "K" at 169.038,31.544 h0.8
D14: Top Overlay "K" at 157.608,31.544 h0.8
D15: Top Overlay "K" at 146.178,31.544 h0.8
D16: Top Overlay "K" at 134.748,31.544 h0.8
P3: Top Overlay "1" at 169.241,-92.56 h1.59 r90